# Altium PCB RVM_EF_PCB1.PcbDoc (part 2 of 2)
Units mm, origin at the board's own origin, x right, y up, seen from the top; angles counter-clockwise.
Board outline 100 x 100 mm, 2 copper layers (Top Layer, Bottom Layer); 92 components, 69 nets, 291 pads, 53 vias.
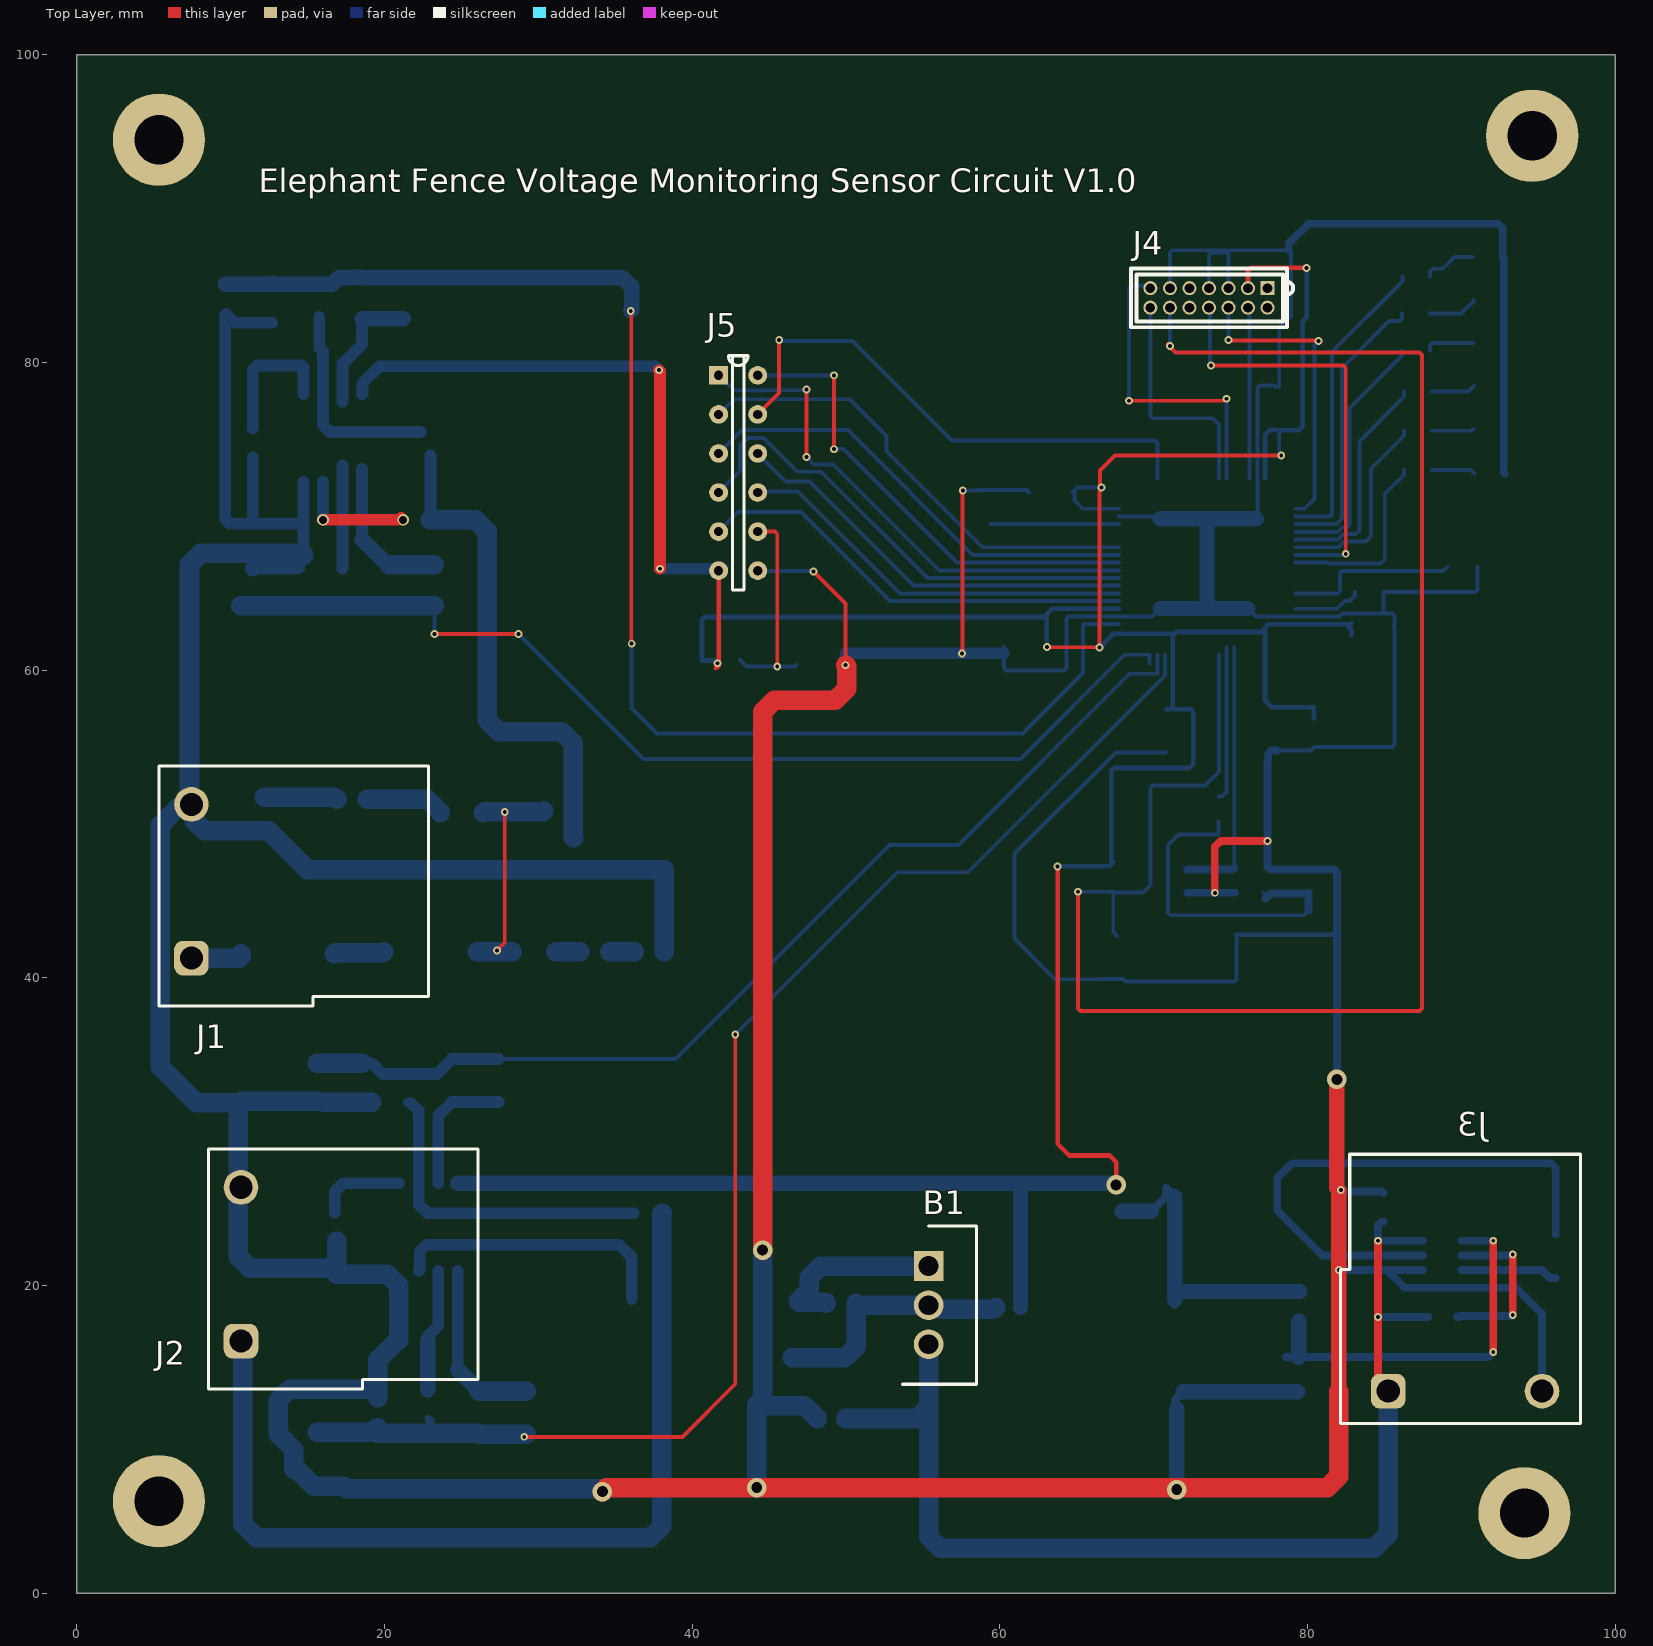
[diagram p0: Top Layer view]

## Via types
v1: diameter 0.508, hole 0.254, Top Layer to Bottom Layer, 45 vias
v2: diameter 1.27, hole 0.711, Top Layer to Bottom Layer, 6 vias
v3: diameter 0.762, hole 0.508, Top Layer to Bottom Layer, 2 vias

## Nets (pads, with @x,y where several pads share a name; then routed paths per layer and width w, separated by ;. In a path a pad name is that pad's centre, name@x,y a point inside that pad or via, vN(x,y) a via of type N, cw(c..) or ccw(c..) an arc to the next point about the centre after c; other vN are vias at no path point) (continued)
VPOS: (continued)
  Bottom Layer w0.508: D1.1@20.19,64.183 D1.1
  Bottom Layer w1.27: 10.668,64.183 20.19,64.183 D2.1@23.241,64.183
XTAL_IN: C19.1 R33.2 X1.3 | length 22.7
  Bottom Layer w0.254: R33.2 74.227,50.17 74.227,49.324 71.613,49.324 70.929,48.641 70.929,44.218 71.078,44.069 79.771,44.069 80.073,44.371 ; X1.3@77.153,45.514 77.279,45.387 X1.3@77.279,45.143
  Bottom Layer w0.508: X1.3@77.279,45.143 X1.3 77.618,45.482 C19.1@80.073,45.482 ; 80.073,44.371 C19.1@80.073,45.482 ; C19.1 C19.1@80.073,45.482
pads on no net: B3.2 B3.3 B3.4 B3.8 B3.9 B3.10 B3.11 B3.12 B3.28 B3.29 B3.33 B3.35 B3.36 B3.37 B3.38 B3.39 B3.40 B3.41 B3.44 B3.45 B3.57 B3.58 B3.59 B3.61 J4.1 J4.2 J4.9 J4.10

## Silkscreen, mask and mechanical layers (free items; w line width, h text height)
Top Overlay:
  text "Elephant Fence Voltage Monitoring Sensor Circuit V1.0" at 11.811,91.059 h1.52

## Text inside footprints (layer, text, board x,y; h text height)
C12: Bottom Overlay "+" at 68.058,20.306 h1.22 r270